# Altium PCB personal_trng_double_sided.PcbDoc
Units mm, origin at the board's own origin, x right, y up, seen from the top; angles counter-clockwise.
Board outline 46 x 74 mm, 2 copper layers (Top Layer, Bottom Layer); 29 components, 36 nets, 140 pads, 0 vias.
Unrouted connection lines stored in the file: 3.
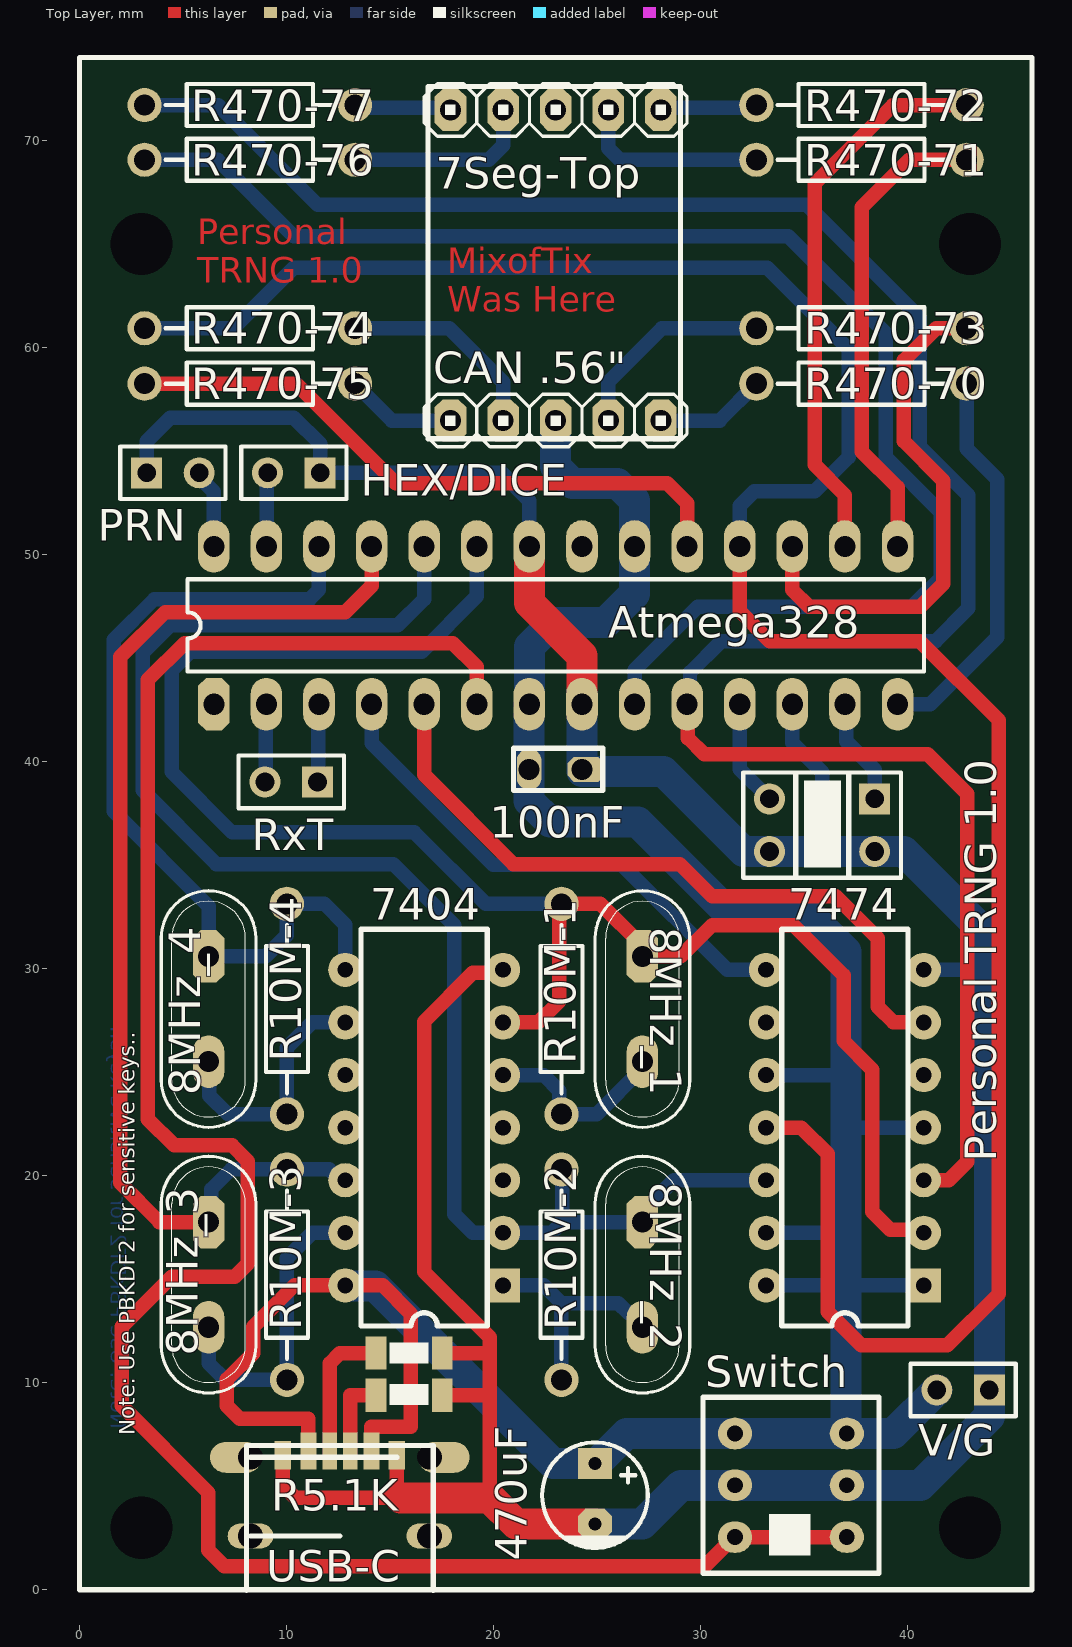
[diagram p0: Top Layer view]
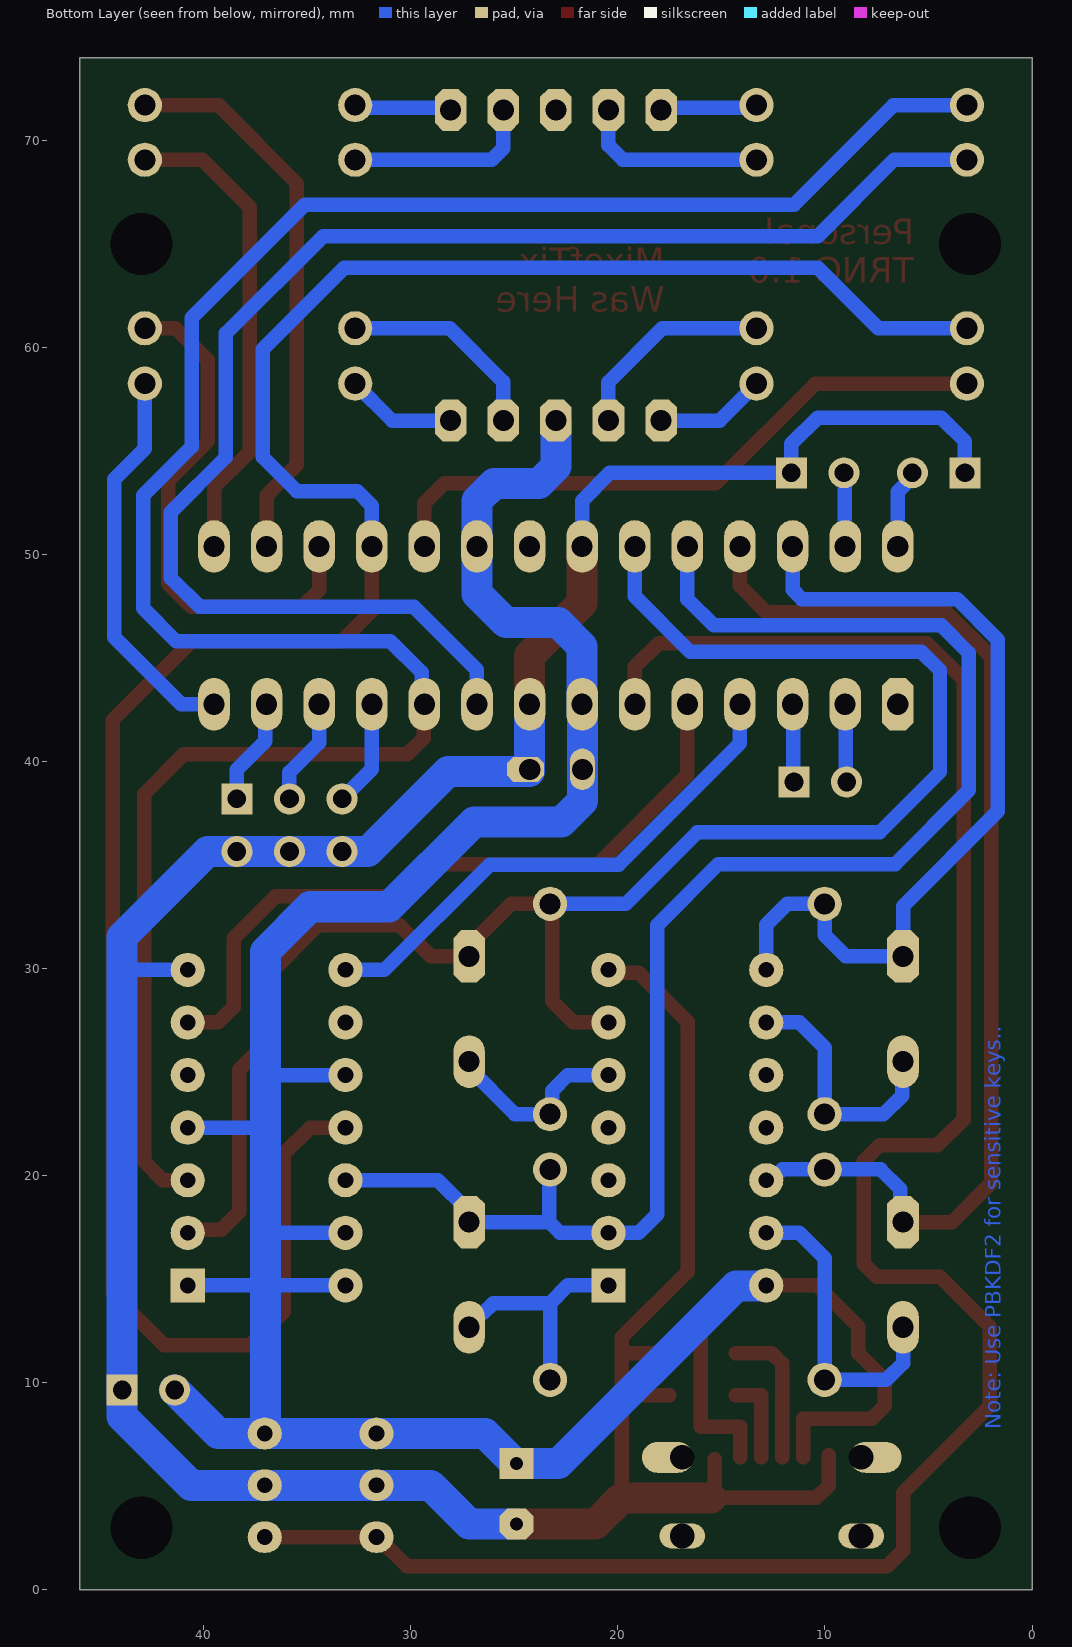
[diagram p1: Bottom Layer view, seen from below]

## Layer stack, top to bottom
Top Solder: solder mask 0.0102, Solder Resist, Dk 3.5
Top Layer: signal copper 0.0356
Dielectric 1: dielectric 0.32, FR-4, Dk 4.8
Bottom Layer: signal copper 0.0356
Bottom Solder: solder mask 0.0102, Solder Resist, Dk 3.5

## Board outline
0,0 0,74 46,74 46,0

## Design rules (kind name [scope] priority, off if disabled: settings)
Clearance [All] p1: gap=0.254 ignorepadtopadclearanceinfootprint=FALSE except(0: Arc-Hole Track-Hole SMDPad-Hole THPad-Hole Via-Hole Fill-Hole Poly-Hole Region-Hole Text-Hole)
PolygonConnect [All] p1: connectstyle=Relief reliefconductorwidth=0.254 reliefentries=4 polygonreliefangle="90 Angle" airgapwidth=0.254
RoutingVias [All] p1: holewidth=0.711 width=1.27 viastyle="Through Hole" minholewidth=0.711 minwidth=1.27 maxholewidth=0.711 maxwidth=1.27
SolderMaskExpansion [All] p1: expansion=0.102 istentingtop=FALSE
Width [All] p1: maxlimit=1.5 minlimit=0.5 preferedwidth=0.7
30 further rules are at their usual default settings.

## Components (designator, comment, footprint, x,y, rotation, side; value= is the part's Value field where it differs from the comment)
7Seg-Top "Header 5" My_1X05 22.995,71.47 r180 top
8MHz_1 "CRYSTAL" My_Crystal 27.186,28.049 r270 top
8MHz_2 "CRYSTAL" My_Crystal 27.186,15.222 r270 top
8MHz_3 "CRYSTAL" My_Crystal 6.231,15.222 r270 top
8MHz_4 "CRYSTAL" My_Crystal 6.231,28.049 r270 top
100nF "Cap" My_cap100n 22.987,39.624 r180 top value=100nF
470uF "Cap" "cap 01" 24.892,4.572 r90 top
7404 "NOT-Gate" dip14 16.645,22.321 r180 top
7474 "Flip-Flop" dip14 36.965,22.321 r180 top
Atmega328 "ATmega328P" My_28P3 22.995,46.578 r0 top
"CAN .56\"" "Header 5" My_1X05 22.995,56.47 r180 top
HEX/DICE "Header 2" HDR1X2 11.622,53.944 r180 top
"Personal TRNG 1.0" "Header 3X2" HDR2X3 38.4,38.196 r180 top
PRN "Header 2" HDR1X2 3.24,53.944 r0 top
R10M-1 "1k" My_axial-0.4 23.289,28.036 r270 top value=Resistor
R10M-2 "1k" My_axial-0.4 23.289,15.209 r270 top value=Resistor
R10M-3 "1k" My_axial-0.4 10.027,15.209 r270 top value=Resistor
R10M-4 "1k" My_axial-0.4 10.027,28.036 r270 top value=Resistor
R470-70 "220" My_axial-0.4 37.778,58.261 r0 top value=Resistor
R470-71 "220" My_axial-0.4 37.778,69.074 r0 top value=Resistor
R470-72 "220" My_axial-0.4 37.778,71.713 r0 top value=Resistor
R470-73 "220" My_axial-0.4 37.778,60.937 r0 top value=Resistor
R470-74 "220" My_axial-0.4 8.212,60.912 r180 top value=Resistor
R470-75 "220" My_axial-0.4 8.212,58.235 r180 top value=Resistor
R470-76 "220" My_axial-0.4 8.212,69.049 r180 top value=Resistor
R470-77 "220" My_axial-0.4 8.212,71.687 r180 top value=Resistor
RxT "Header 2" HDR1X2 11.495,39.016 r180 top
Switch "Double Switch" "Switch - DPDT" 34.355,5.049 r180 top
V/G "Header 2" HDR1X2 43.942,9.652 r180 top

## Footprints (in the part's own frame and the unit in brackets; to place one, negate y for a bottom-side part, rotate by r counter-clockwise, add the part's x,y. Pads: shape width x height; smd on the part's side, far side on the other; paste and mask are expansions set on the pad)
"cap 01" [mil]
  rect 59.06x65 hole 25: 1(60,0)
  oct 59.06x65 hole 25: 2(-55,0)
  silkscreen extent -100,-100 100,100, body extent -99,-99 99,99, height 494
dip14 [mil]
  rect 65x65 hole 30: 1(-150,300)
  round 65 hole 30: 2(-150,200) 3(-150,100) 4(-150,0) 5(-150,-100) 6(-150,-200) 7(-150,-300) 8(150,-300) 9(150,-200) 10(150,-100) 11(150,0) 12(150,100) 13(150,200) 14(150,300)
  silkscreen extent -120,-377 120,377, body extent -155,-384 155,384, height 200
HDR1X2 [mm] "Connector; Header; 2 Position"
  rect 1.5x1.5 hole 0.9: 1(0,0)
  round 1.5 hole 0.9: 2(2.54,0)
  silkscreen extent -1.27,-1.27 3.81,1.27
HDR2X3 [mm] "Connector; Header; 3x2 Position"
  rect 1.5x1.5 hole 0.9: 1(0,0)
  round 1.5 hole 0.9: 2(0,2.54) 3(2.54,0) 4(2.54,2.54) 5(5.08,0) 6(5.08,2.54)
  silkscreen extent -1.27,-1.27 6.35,3.81
My_1X05 [mil]
  oct 60x80 hole 40: 1(-200,0) 2(-100,0) 3(0,0) 4(100,0) 5(200,0)
  silkscreen extent -250,-50 250,50
My_28P3 [mil]
  oct 60x100 hole 40: 1(-650,-150)
  oval 60x100 hole 40: 2(-550,-150) 3(-450,-150) 4(-350,-150) 5(-250,-150) 6(-150,-150) 7(-50,-150) 8(50,-150) 9(150,-150) 10(250,-150) 11(350,-150) 12(450,-150) 13(550,-150) 14(650,-150) 15(650,150) 16(550,150) 17(450,150) 18(350,150) 19(250,150) 20(150,150) 21(50,150) 22(-50,150) 23(-150,150) 24(-250,150) 25(-350,150) 26(-450,150) 27(-550,150) 28(-650,150)
  silkscreen extent -700,-88 700,88
My_axial-0.4 [mil]
  round 65 hole 40: 1(-200.5,-0.5) 2(199.5,-0.5)
  silkscreen extent -160,-41 160,40
My_cap100n [mm]
  oct 1.8x1.2 hole 1.016 copper offset -0.2,0: 1(-1.27,0)
  oval 1.2x2 hole 1.016: 2(1.27,0)
  silkscreen extent -2.29,-1.02 2.03,1.02
My_Crystal [mil]
  oct 100x60 hole 40: 1(-100,0)
  oval 100x60 hole 40: 2(100,0)
  silkscreen extent -225,-90 225,90
"Switch - DPDT" [mil]
  oval 65x60 hole 30: 1(-106.3,98.43) 2(-106.3,0) 3(-106.3,-98.43) 4(106.3,-98.43) 5(106.3,0) 6(106.3,98.43)
  silkscreen extent -167,-167 167,167, body extent -167,-167 167,167, height 559

## Part data
7Seg-Top "CAN .56\"": "Header, 5-Pin", LatestRevisionDate=17-Jul-2002, LatestRevisionNote="Re-released for DXP Platform.", Publisher="Altium Limited"
8MHz_1 8MHz_2 8MHz_3 8MHz_4: "Crystal"
100nF: library part "Cap ceramic", "CAP-100Nf"
470uF: library part Cap-Polar, "Polar Capacitor", Adding Date=1387/12/20, Designer="Saeid Jorablo", Organazation=ControTec
7404: library part SN7404, "Hex Inverter", Manufactorer="Texas Instrument", Adding Date=1387/12/22, Company=ControTec, ComponentLink1Description="Data Sheet", Designer="Saeid Jorablo"
7474: library part SN7474N, "Dual D Flip Flop", Manufactorer="Texas Instrument", Adding Date=1387/12/22, Company=ControTec, ComponentLink1Description="Data Sheet", Designer="Saeid Jorablo"
Atmega328: library part ATmega8-16PI, "AVR 8K Bytes of In-System Programmable Flash Memory", ComponentLink1Description="Manufacturer Link", ComponentLink1URL=http://www.atmel.com, ComponentLink2Description=Datasheet, ComponentLink2URL=http://www.atmel.com/dyn/resources/prod_documents/doc2486.pdf, DatasheetVersion=2486H-AVR-09/02, LatestRevisionDate=04-Mar-2005, LatestRevisionNote="Stylized 3D Model Added.", PackageDescription="DIP; 28 Leads; Row Spacing 7.62 mm; Pitch 2.54 mm", PackageReference=28P3, PackageVersion="revB, Sep-2001", Published=17-Sep-2003, Publisher="Altium Limited"
HEX/DICE PRN RxT V/G: "Header, 2-Pin", LatestRevisionDate=17-Jul-2002, LatestRevisionNote="Re-released for DXP Platform.", Publisher="Altium Limited"
"Personal TRNG 1.0": "Header, 3-Pin, Dual row", LatestRevisionDate=17-Jul-2002, LatestRevisionNote="Re-released for DXP Platform.", Publisher="Altium Limited"
R10M-1 R10M-2 R10M-3 R10M-4 R470-70 R470-71 R470-72 R470-73 R470-74 R470-75 R470-76 R470-77: library part Res, "resistor 1/4 wat"
Switch: library part "Switch - DPDT", "DPDT Switch"

## Free pads (board coordinates)
  round 1.524 hole 3: 3(3,3) 3(3,65) 3(43,3) 3(43,65)
  oval 2.2x1.2 hole 1.2: 5(8.255,2.6) 5(16.895,2.6)
  oval 2.5x1.5 hole 1.2 copper offset -0.7,0: 5(8.255,6.4)
  oval 2.5x1.5 hole 1.2 copper offset 0.7,0: 5(16.895,6.4)
  rect 0.8x1.4 smd: 6(9.825,6.5) 9(15.325,6.5)
  rect 0.76x1.8 smd: 7(11.055,6.7) 8(14.095,6.7)
  rect 1x1.6 smd: 10(14.316,11.43) 11(17.516,11.43) 14(14.316,9.398) 15(17.516,9.398)
  rect 0.7x1.8 smd: 12(12.075,6.7) 13(13.075,6.7)

## Nets (pads, with @x,y where several pads share a name; then routed paths per layer and width w, separated by ;. In a path a pad name is that pad's centre, name@x,y a point inside that pad or via, vN(x,y) a via of type N, cw(c..) or ccw(c..) an arc to the next point about the centre after c; other vN are vias at no path point)
GND: 100nF.1 470uF.2 7404.7 7474.7 "Personal TRNG 1.0.2" "Personal TRNG 1.0.4" "Personal TRNG 1.0.6" Atmega328.8 Atmega328.22 HEX/DICE.1 pad.6 pad.9 pad.10 pad.11 pad.12 pad.13 pad.14 pad.15 PRN.1 Switch.2 Switch.5 V/G.1 | length 171.6
  Top Layer w0.7: pad.6 9.825,5.034 10.414,4.445 15.494,4.445 15.325,4.614 pad.9@15.325,6.308 ; pad.12@12.075,6.4 12.075,10.932 12.573,11.43 pad.10 ; pad.13@13.075,6.4 13.075,9.398 pad.14 ; pad.15 19.812,9.398 ; pad.11 19.685,11.43 ; 19.812,4.445 19.812,9.398 ; 7404.7 20.308,29.794 18.999,29.794 16.637,27.432 16.637,15.367 19.812,12.192 19.812,11.43 19.812,9.398
  Top Layer w1.5: 15.494,4.445 19.812,4.445 21.082,3.175 470uF.2 ; Atmega328.22 21.725,47.651 24.265,45.111 Atmega328.8
  Bottom Layer w0.7: PRN.1 3.24,55.468 4.383,56.611 10.352,56.611 11.622,55.341 HEX/DICE.1 20.385,53.944 21.725,52.604 Atmega328.22 ; 7474.7 43.942,29.941
  Bottom Layer w1.5: Atmega328.8 24.27,42.763 24.27,39.645 24.31,39.605 100nF.1@24.31,39.581 ; 100nF.1@24.27,39.518 28.194,39.518 ; 470uF.2 27.178,3.175 29.052,5.049 Switch.5 Switch.2 40.609,5.049 43.942,8.382 43.942,29.941 43.942,31.53 39.816,35.656 38.4,35.656 35.86,35.656 33.32,35.656 32.069,35.656 28.207,39.518
Net7Seg-Top_1: 7Seg-Top.1 R470-72.1 | length 4.7
  Bottom Layer w0.7: 7Seg-Top.1 28.19,71.585 32.57,71.585 R470-72.1 ; R470-72.1@32.679,71.476 R470-72.1@32.685,71.483
Net7Seg-Top_2: 7Seg-Top.2 R470-71.1 | length 9.2
  Bottom Layer w0.7: 7Seg-Top.2 25.535,69.622 26.096,69.061 R470-71.1
Net7Seg-Top_4: 7Seg-Top.4 R470-76.1 | length 9.1
  Bottom Layer w0.7: R470-76.1 19.754,69.061 20.455,69.762 7Seg-Top.4
Net7Seg-Top_5: 7Seg-Top.5 R470-77.1 | length 4.7
  Bottom Layer w0.7: R470-77.1@13.305,71.483 R470-77.1@13.311,71.476 ; R470-77.1 13.42,71.585 17.8,71.585 7Seg-Top.5
Net8MHz_1_1: 8MHz_1.1 7404.6 7474.2 Atmega328.23 R10M-1.1 | length 84.7
  Top Layer w0.7: 7404.6@20.623,27.568 7404.6 22.163,27.401 23.179,28.417 23.179,33.032 R10M-1.1 25.154,33.129 27.186,31.097 8MHz_1.1 29.034,30.589 30.545,32.1 34.482,32.1 36.895,29.687 36.895,26.512 38.292,25.115 38.292,18.257 39.161,17.388 40.628,17.388 7474.2
  Bottom Layer w0.7: Atmega328.23 19.185,47.975 16.518,45.308 5.342,45.308 4.445,44.411 4.445,39.497 7.366,36.576 16.163,36.576 19.61,33.129 R10M-1.1
Net8MHz_1_2: 8MHz_1.2 7404.5 R10M-1.2 | length 9.6
  Bottom Layer w0.7: 7404.5 22.417,24.861 23.166,24.112 23.166,23.078 R10M-1.2 ; R10M-1.2@23.458,23.15 R10M-1.2 ; 8MHz_1.2 27.186,25.185 24.97,22.969 R10M-1.2
Net8MHz_2_1: 8MHz_2.1 7404.2 7474.12 Atmega328.24 R10M-2.1 | length 74.9
  Top Layer w0.7: 8MHz_2.1 8MHz_2.1@27.186,18.27
  Bottom Layer w0.7: Atmega328.24 16.645,47.848 15.375,46.578 4.383,46.578 3.048,45.243 3.048,38.608 6.604,35.052 15.147,35.052 18.099,32.1 18.099,18.13 18.988,17.241 22.798,17.241 23.319,17.762 ; R10M-2.1 23.319,20.259 23.319,17.762 ; 8MHz_2.1 23.319,17.762 ; 8MHz_2.1@27.186,18.27 28.697,19.781 7474.12
Net8MHz_2_2: 8MHz_2.2 7404.1 R10M-2.2 | length 11.4
  Bottom Layer w0.7: 7404.1 22.417,14.701 23.276,13.842 ; R10M-2.2 23.276,13.842 ; 8MHz_2.2 27.186,12.967 26.805,13.347 26.52,13.347 26.026,13.842 23.276,13.842
Net8MHz_3_1: 8MHz_3.1 7404.12 Atmega328.25 R10M-3.1 | length 54.6
  Top Layer w0.7: 8MHz_3.1 3.862,17.762 1.97,19.654 1.97,45.054 4.129,47.213 12.835,47.213 14.105,48.483 Atmega328.25
  Bottom Layer w0.7: 8MHz_3.1 6.372,17.903 6.372,19.357 7.317,20.302 R10M-3.1 12.057,20.302 12.578,19.781 7404.12
Net8MHz_3_2: 8MHz_3.2 7404.13 R10M-3.2 | length 15.3
  Bottom Layer w0.7: 8MHz_3.2@6.389,12.524 8MHz_3.2 6.231,10.948 7.037,10.142 R10M-3.2 10.014,16.014 11.241,17.241 7404.13
Net8MHz_4_1: 8MHz_4.1 7404.8 Atmega328.26 R10M-4.1 | length 41.3
  Bottom Layer w0.7: R10M-4.1@9.889,33.004 R10M-4.1 10.014,31.604 8.999,30.589 8MHz_4.1 6.231,33.012 1.651,37.592 1.651,45.878 3.621,47.848 11.114,47.848 11.565,48.299 Atmega328.26 ; R10M-4.1@10.25,33.097 10.282,33.129 11.829,33.129 12.835,32.123 7404.8
Net8MHz_4_2: 8MHz_4.2 7404.9 R10M-4.2 | length 12.3
  Bottom Layer w0.7: 8MHz_4.2 6.263,25.477 6.263,23.87 7.177,22.956 10.001,22.956 R10M-4.2 10.014,26.174 11.241,27.401 7404.9
Net7474_3: 7474.3 Atmega328.10 R470-77.2 | length 109.5
  Top Layer w0.7: Atmega328.10 29.383,42.73 29.383,41.136 30.164,40.355 40.959,40.355 42.864,38.45 42.864,20.67 41.975,19.781 7474.3
  Bottom Layer w0.7: R470-77.2 6.693,71.7 11.495,66.898 35.117,66.898 40.578,61.437 40.578,55.214 42.926,52.866 42.926,47.402 41.34,45.816 30.996,45.816 29.482,44.302 29.482,42.905 Atmega328.10
Net7474_6: 7474.6 Atmega328.5 | length 34.7
  Top Layer w0.7: Atmega328.5 16.645,39.362 20.955,35.052 28.99,35.052 30.545,33.497 36.514,33.497 38.546,31.465 38.546,28.163 39.308,27.401 7474.6 7474.6@40.593,27.219
Net7474_8: 7474.8 Atmega328.4 | length 25.7
  Top Layer w0.7: Atmega328.4 Atmega328.4@14.263,42.61
  Bottom Layer w0.7: Atmega328.4 14.105,40.886 19.97,35.021 26.193,35.021 31.273,29.941 7474.8
Net7474_11: 7474.11 Atmega328.18 R470-74.2 | length 116.9
  Top Layer w0.7: Atmega328.18 31.885,47.27 33.339,45.816 40.578,45.816 44.388,42.006 44.388,14.289 41.91,11.811 37.753,11.811 36.133,13.431 36.133,21.051 34.863,22.321 7474.11
  Bottom Layer w0.7: R470-74.2 7.427,60.925 10.352,63.85 33.212,63.85 37.149,59.913 37.149,54.706 35.498,53.055 32.577,53.055 31.885,52.363 Atmega328.18
NetAtmega328_2: Atmega328.2 RxT.2 | length 3.8
  Bottom Layer w0.7: RxT.2 8.99,39.051 Atmega328.2@8.99,42.733 ; Atmega328.2@8.955,42.698 Atmega328.2@8.99,42.733 ; Atmega328.2 Atmega328.2@8.99,42.733
NetAtmega328_3: Atmega328.3 RxT.1 | length 3.8
  Bottom Layer w0.7: RxT.1 11.53,39.051 Atmega328.3@11.53,42.733 ; Atmega328.3@11.495,42.698 Atmega328.3@11.53,42.733 ; Atmega328.3 Atmega328.3@11.53,42.733
NetAtmega328_6: Atmega328.6 Switch.1 Switch.6 | length 102.3
  Top Layer w0.7: Atmega328.6 19.185,44.569 18.034,45.72 5.08,45.72 3.302,43.942 3.302,22.733 4.572,21.463 7.366,21.463 8.128,20.701 8.128,15.748 7.493,15.113 4.445,15.113 2.032,12.7 2.032,8.89 6.223,4.699 6.223,1.905 6.985,1.143 30.186,1.143 31.592,2.549 Switch.6 Switch.1
NetAtmega328_9: Atmega328.9 R470-76.2 | length 70.5
  Bottom Layer w0.7: R470-76.2 6.665,69.061 10.352,65.374 34.228,65.374 38.927,60.675 38.927,54.706 41.594,52.039 41.594,48.864 40.197,47.467 29.853,47.467 26.815,44.429 26.815,42.778 Atmega328.9
NetAtmega328_11: "Personal TRNG 1.0.5" Atmega328.11 | length 5.2
  Bottom Layer w0.7: Atmega328.11 31.885,39.631 33.32,38.196
NetAtmega328_12: "Personal TRNG 1.0.3" Atmega328.12 | length 5.2
  Bottom Layer w0.7: Atmega328.12 34.425,40.92 35.86,39.485 35.86,38.196
NetAtmega328_13: "Personal TRNG 1.0.1" Atmega328.13 | length 5.2
  Bottom Layer w0.7: Atmega328.13 37.022,42.711 37.022,40.99 38.4,39.612 38.4,38.196
NetAtmega328_14: Atmega328.14 R470-70.2 | length 19
  Bottom Layer w0.7: Atmega328.14 41.086,42.768 44.323,46.005 44.323,53.628 42.845,55.106 R470-70.2
NetAtmega328_15: Atmega328.15 R470-71.2 | length 23.1
  Top Layer w0.7: Atmega328.15 39.505,53.239 37.784,54.96 37.784,66.771 40.074,69.061 R470-71.2
NetAtmega328_16: Atmega328.16 R470-72.2 | length 27.1
  Top Layer w0.7: Atmega328.16 36.965,52.858 35.498,54.325 35.498,67.914 39.284,71.7 R470-72.2 ; R470-72.2@42.809,71.518 R470-72.2@42.845,71.483
NetAtmega328_17: Atmega328.17 R470-73.2 | length 25.5
  Top Layer w0.7: Atmega328.17 34.425,48.286 35.244,47.467 40.609,47.467 41.721,48.579 41.721,53.563 39.816,55.468 39.816,59.374 41.367,60.925 R470-73.2
NetAtmega328_19: Atmega328.19 R470-75.2 | length 30.7
  Top Layer w0.7: R470-75.2 10.459,58.248 15.271,53.436 28.386,53.436 29.345,52.477 Atmega328.19
NetAtmega328_27: Atmega328.27 HEX/DICE.2 | length 3.8
  Bottom Layer w0.7: Atmega328.27@8.888,50.525 Atmega328.27 9.054,50.417 9.054,53.916 HEX/DICE.2
NetAtmega328_28: Atmega328.28 PRN.2 | length 3.8
  Bottom Layer w0.7: PRN.2 5.78,53.728 6.485,53.023 Atmega328.28
"NetCAN .56\"_1": "CAN .56\".1" R470-70.1 | length 5.3
  Bottom Layer w0.7: 28.075,56.47 30.907,56.47 R470-70.1
"NetCAN .56\"_2": "CAN .56\".2" R470-73.1 | length 10.1
  Bottom Layer w0.7: 25.535,56.47 25.535,58.332 28.128,60.925 R470-73.1
"NetCAN .56\"_4": "CAN .56\".4" R470-74.1 | length 10.1
  Bottom Layer w0.7: R470-74.1 17.849,60.925 20.455,58.319 20.455,56.47
"NetCAN .56\"_5": "CAN .56\".5" R470-75.1 | length 5.3
  Bottom Layer w0.7: R470-75.1 15.083,56.47 17.915,56.47
VCC: 7Seg-Top.3 100nF.2 470uF.1 7404.14 7474.1 7474.4 7474.10 7474.13 7474.14 "CAN .56\".3" Atmega328.7 Atmega328.20 pad.7 pad.8 Switch.3 Switch.4 V/G.2 | length 147.3
  Top Layer w0.7: 11.049,8.255 7.747,8.255 7.112,8.89 7.112,10.16 8.382,11.43 8.382,12.7 10.383,14.701 7404.14 14.636,14.701 16.002,13.335 16.002,7.874 14.097,7.874 14.095,7.872 pad.8@14.095,6.4 ; pad.7@11.055,6.4 pad.7 11.055,8.255
  Bottom Layer w0.7: 7474.14 36.895,14.701 37.022,14.574 37.149,14.701 7474.1 ; 7474.13 36.895,17.241 ; 7474.10 37.022,24.861 ; 37.022,22.321 7474.4
  Bottom Layer w1.5: 7404.14 12.864,14.672 14.284,14.672 22.86,6.096 470uF.1 24.967,6.096 26.42,7.549 Switch.4 Switch.3@37.022,7.549 ; Atmega328.7@21.717,42.76 21.72,42.757 21.72,42.238 21.717,42.235 100nF.2 21.714,39.621 21.714,38.103 22.733,37.084 26.958,37.084 31.053,32.989 34.863,32.989 37.022,30.83 37.022,24.861 37.022,22.321 37.022,14.574 Switch.3@37.022,7.549 ; Atmega328.7 21.725,45.562 22.868,46.705 25.408,46.705 26.805,48.102 Atmega328.20 26.805,52.604 25.973,53.436 23.814,53.436 22.995,54.255 22.995,56.47 ; V/G.2 39.299,7.549 Switch.3 Switch.3@37.022,7.549
pads on no net: 7404.3 7404.4 7404.10 7404.11 7474.5 7474.9 Atmega328.1 Atmega328.21

## Other copper
Top Layer:
  text "Personal / TRNG 1.0" at 5.684,63.119 h1.24
  text "MixofTix / Was Here" at 17.749,61.722 h1.24
Bottom Layer:
  text "Note: Use PBKDF2 for sensitive keys.." at 1.52,7.747 h0.75 r270

## Silkscreen, mask and mechanical layers (free items; w line width, h text height)
Top Overlay:
  rectangle: 14.959,8.919 16.859,9.935
  rectangle: 14.959,10.922 16.859,11.938
  region: 36.768,34.894 36.768,39.085 34.99,39.085 34.99,34.894
  lines w0.254: 8.066,-0.031 8.066,6.969 17.066,6.969 ; 8.255,2.6 12.575,2.6 ; 8.255,6.4 12.575,6.4 ; 9.825,6.4 12.575,6.4 ; 11.055,6.4 12.575,6.4 ; 12.075,6.4 12.575,6.4 ; 13.075,6.4 12.575,6.4 ; 14.095,6.4 12.575,6.4 ; 15.325,6.4 12.575,6.4 ; 17.083,-0.031 17.083,6.969 ; 34.588,34.456 34.588,39.312 ; 37.149,34.513 37.149,39.339 ; 0,0 46,0 46,74 0,74 0,0 ; 16.832,55.595 29.021,55.595 29.021,72.595 16.832,72.595 16.832,55.595
  text "Note: Use PBKDF2 for sensitive keys.." at 2.667,7.462 h0.75 r90
  text "R5.1K" at 9.271,3.81 h1.52
  text "USB-C" at 9.017,0.381 h1.52
Mechanical 1:
  circle w0.254: c43,65 r2.5
  circle w0.254: c3,65 r2.5
  circle w0.254: c43,3 r2.5
  circle w0.254: c3,3 r2.5
  lines w0.254: -0.062,0 45.912,0 ; 0,0 0,74.01 ; 0,74 46,74 46,-2.286 ; 6.485,45.054 6.485,76.931 ; 8.255,2.6 16.895,2.6 ; 8.255,6.4 16.895,6.4 ; 9.025,7.874 9.025,53.817 ; 11.565,8.128 11.565,77.185 ; 14.105,8.001 14.105,77.185 ; 16.645,8.89 16.645,50.388 ; 19.185,9.017 19.185,50.388 ; 21.725,5.881 21.725,50.388 ; 22.741,53.563 22.977,53.563 ; 22.995,6.954 22.995,77.566 ; 24.265,6.389 24.265,50.388 ; 31.885,5.303 31.885,78.455 ; 34.425,5.43 34.425,78.328 ; 36.965,5.43 36.965,53.817 ; 39.505,45.054 39.505,76.296

## Dimensions
8.255,2.6 to -0.062,0 on Mechanical 1
8.255,6.4 to 16.895,6.4 on Mechanical 1
8.255,6.4 to 8.255,2.6 on Mechanical 1
43,3 to 45.912,0 on Mechanical 1
43,65 to 46,74 on Mechanical 1
14.316,9.398 to 17.516,9.398 on Mechanical 1
43,3 to 46,-2.286 on Mechanical 1
3,3 to 0,74.01 on Mechanical 1
0,74 to 22.995,77.566 on Mechanical 1
39.505,45.054 to 46,74 on Mechanical 1
0,0 to 0,74 on Mechanical 1
0,74 to 46,74 on Mechanical 1
17.915,71.47 to 17.915,56.47 on Mechanical 1